# Altium PCB STM32_Dev_Board.PcbDoc (part 2 of 2)
Units mm, origin at the board's own origin, x right, y up, seen from the top; angles counter-clockwise.
Board outline 84.25 x 50.53 mm, 4 copper layers (Top Layer, Int1 (GND), Int2 (PWR), Bottom Layer), stack 1.57 mm thick; 70 components, 69 nets, 319 pads, 189 vias.
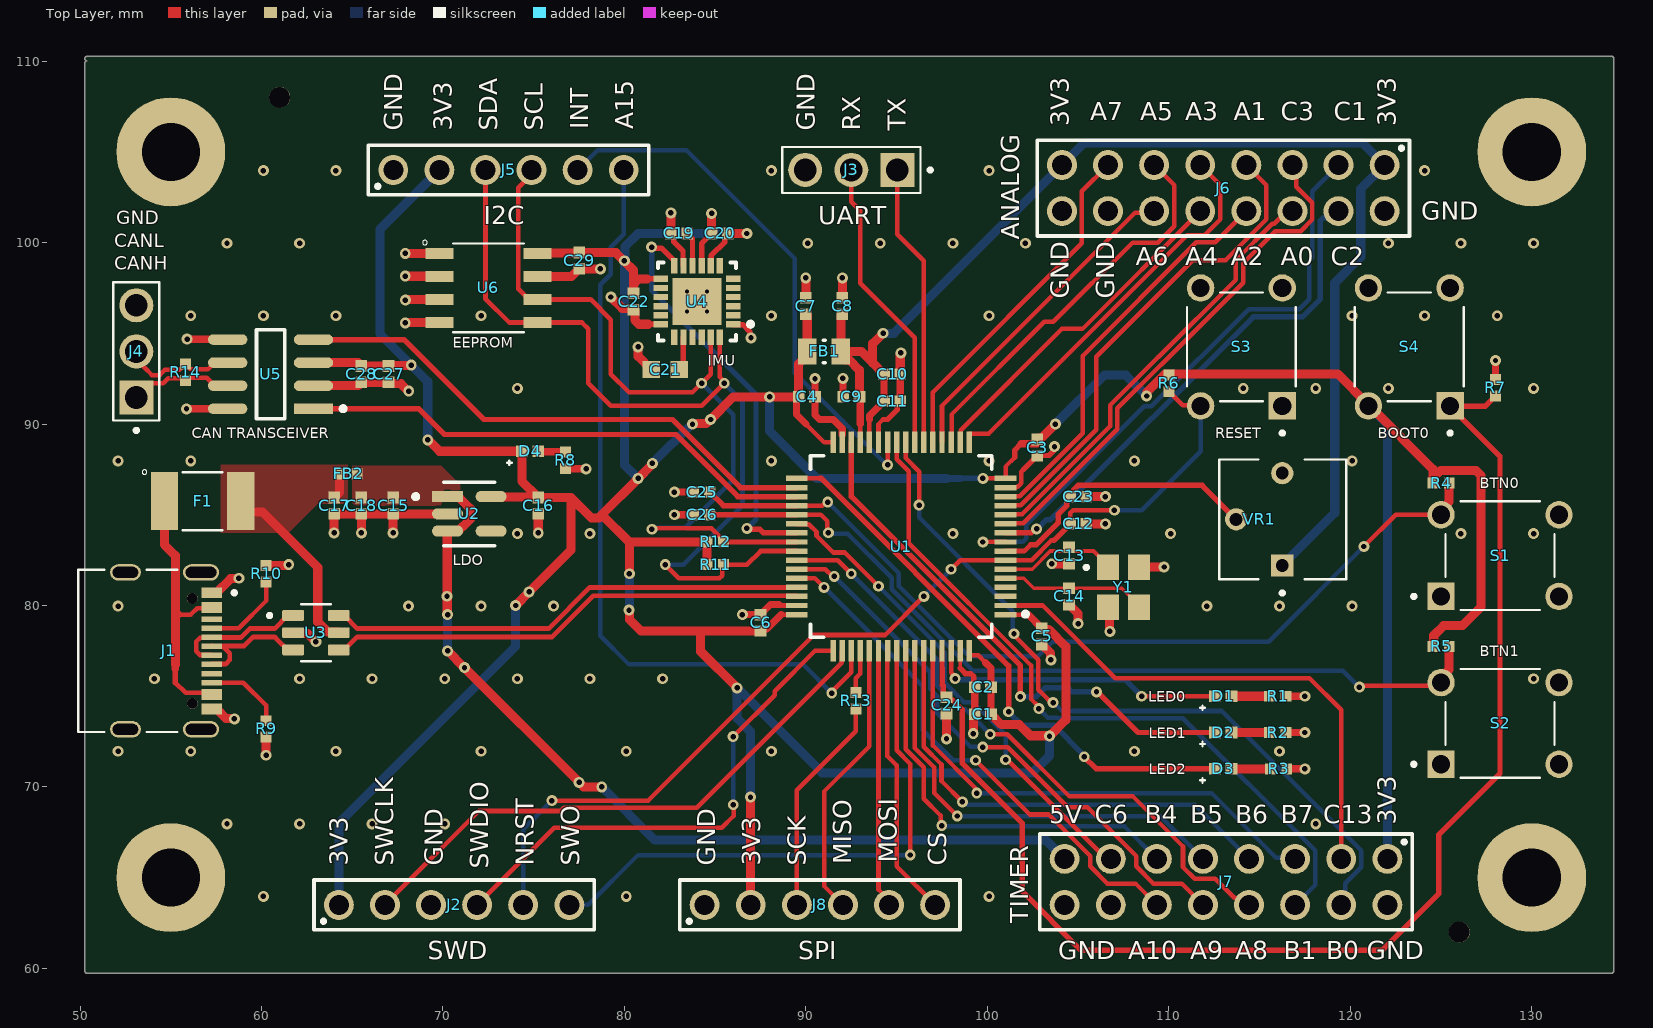
[diagram p0: Top Layer view]

## Via types
v1: diameter 0.6, hole 0.3, Top Layer to Bottom Layer, 185 vias
v2: diameter 0.5, hole 0.2, Top Layer to Bottom Layer, 4 vias

## Nets (pads, with @x,y where several pads share a name; then routed paths per layer and width w, separated by ;. In a path a pad name is that pad's centre, name@x,y a point inside that pad or via, vN(x,y) a via of type N, cw(c..) or ccw(c..) an arc to the next point about the centre after c; other vN are vias at no path point) (continued)
I2C3_SCL: (continued)
  Top Layer w0.26: J5.4 74.88,103.752 74.145,103.016 74.145,97.445 74.725,96.865 U6.6 78.135,96.865 79.25,95.75 79.25,92.75 80.25,91.75 83.75,91.75 84.75,92.75 U4.23 ; v1(81.508,84.2) 81.558,84.25 84.796,84.25 85.28,83.766 85.28,83.67 R12.1 U1.40
  Bottom Layer w0.26: v1(81.508,84.2) 81.573,84.265 83.329,84.265 86,86.936 86,90.5 v1(84.25,92.25)
I2C3_SDA: J5.3 R11.1 U1.41 U4.24 U6.5 | length 48.9
  Top Layer w0.26: J5.3 72.34,96.91 73.655,95.595 U6.5 77.655,95.595 78,95.25 78,92.25 79.25,91 84.25,91 v1(85.5,92.25) 85.5,92.342 85.25,92.592 U4.24 ; v1(82.25,82.25) 83,81.5 85.235,81.5 85.388,81.652 85.388,82.188 R11.1 86.75,82.25 87.5,83 U1.41
  Bottom Layer w0.26: v1(82.25,82.25) 83.25,82.25 86.5,85.5 86.5,91.25 v1(85.5,92.25)
IMU_CPOUT: C21.2 U4.20 | length 1.9
  Top Layer w0.3: C21.2 83.25,93.225 U4.20
IMU_INT: U1.39 U4.12 | length 22.8
  Top Layer w0.3: v1(81.5,99.75) 81.557,99.693 82.032,99.693 82.75,98.975 U4.12 ; v1(86.75,84.25) 86.807,84.193 87.457,84.193 87.65,84 U1.39
  Bottom Layer w0.3: v1(81.5,99.75) 81.5,97.372 87.25,91.622 87.25,84.75 v1(86.75,84.25)
IMU_REGOUT: C19.2 U4.10 | length 1.9
  Top Layer w0.3: C19.2 83.75,100.2 U4.10
JTAG_SWCLK: J2.2 U1.50 | length 31.4
  Top Layer w0.25: J2.2 71.975,68.675 76.489,68.675 76.664,68.85 83.989,68.85 91.975,76.836 91.975,77.475 U1.50
JTAG_SWDIO: J2.4 U1.49 | length 28.1
  Top Layer w0.25: J2.4 76.13,67.75 85.362,67.75 86.011,68.399 v1@86.011,69.006 ; v1(85.984,72.77) 88.276,75.062 88.276,75.276 90.5,77.5 U1.49
  Bottom Layer w0.25: v1(85.984,72.77) 85.991,72.764 85.991,69.026 v1(85.998,69.02)
JTAG_SWO: J2.6 U1.56 | length 31.5
  Top Layer w0.25: U1.56 95,72.015 95.75,71.265 v1(95.75,66.25)
  Bottom Layer w0.25: J2.6 76.974,63.514 78.014,63.514 80.748,66.248 v1@95.748,66.248
LED0: D1.2 U1.62 | length 16.4
  Top Layer w0.25: U1.62 98,76.288 98.222,76.066 v1(98.222,75.972) ; v1(108.5,75) D1.2
  Bottom Layer w0.3: v1(98.222,75.972) 98.276,75.917 107.583,75.917 v1(108.5,75)
LED1: D2.2 U1.30 | length 29.8
  Top Layer w0.3: U1.30 92.5,85.998 101.815,76.683 v1(101.815,74.975) ; v1(106.014,75.238) 106.065,75.238 108.301,73.001 112.549,73.001 D2.2
  Bottom Layer w0.3: v1(101.815,74.975) 102.7,74.975 103.185,75.46 104.445,75.46 104.667,75.238 v1(106.014,75.238)
LED2: D3.2 U1.33 | length 31.2
  Top Layer w0.25: U1.33 90.77,87
  Top Layer w0.3: 90.77,87 90.849,87 101.173,76.675 v1(101.173,74.144) ; v1(105.337,71.664) 105.992,71.009 112.541,71.009 D3.2
  Bottom Layer w0.3: v1(101.173,74.144) 101.916,73.401 103.671,73.401 105.337,71.734 v1(105.337,71.664)
MCU_BOOT0: C24.2 R7.2 S4.1 U1.61 | length 72.7
  Top Layer w0.26: 97.5,76.57 U1.61
  Top Layer w0.3: 97.52,76.55 97.52,75.631 97.58,75.571 97.58,75.12 C24.2@97.681,75.019 ; C24.2@97.801,74.848 97.869,74.78 98.084,74.78 98.622,74.243 98.622,71.303 101.91,68.014 101.91,64.259 105.169,61 121.75,61 124.875,64.125 124.875,67.375 128.25,70.75 128.25,88.22 126.104,90.366 126.104,90.396 S4.1@125.53,90.97 ; S4.1@125.511,90.989 127.439,90.989 R7.2
  Top Layer w0.4: C24.2@97.681,75.019 C24.2
MCU_NRST: C12.2 J2.5 R6.1 S3.3 U1.7 | length 55.6
  Top Layer w0.25: v1(76,69.25) 81.313,69.25 90.438,78.375 94.375,78.375 v1(96.5,80.5) ; v1(98,82) 98.5,82.5 U1.7 102.442,82.5 103.529,83.587 103.663,83.587 ; C12.2 104.573,84.523 104.573,85.099 104.724,85.25 v1(107,85.25) ; R6.1 110.767,91.033 111.717,91.033 S3.3@111.745,91.005
  Top Layer w0.3: 103.663,83.587 104.348,84.273 104.348,84.298 C12.2
  Bottom Layer w0.25: J2.5 74.42,67.67 v1(76,69.25) ; v1(96.5,80.5) v1(98,82) ; v1(107,85.25) 108.5,85.25 111.75,88.5 S3.3@111.75,91.5
MCU_OSC_IN: C14.2 U1.5 Y1.3 | length 8.1
  Top Layer w0.2: U1.5 102,81.5 102.55,80.95 C14.2 107.4,80.95 108.35,80 Y1.3
MCU_OSC_OUT: C13.2 U1.6 Y1.1 | length 6.7
  Top Layer w0.2: U1.6 102.472,82 103.472,83 104.3,83 C13.2 104.7,83 105.85,83 106.65,82.2 Y1.1
NetC23_2: C23.2 U1.8 VR1.2 | length 15.5
  Top Layer w0.26: U1.8 102.025,83 102.378,83.353
  Top Layer w0.3: 102.378,83.353 102.694,83.353 103.898,84.557 103.898,85.025 104.38,85.507 104.38,85.842 C23.2@104.538,86 ; C23.2 104.72,86.17 104.72,86.334 105.006,86.62 111.84,86.62 VR1.2
NetD1_1: D1.1 R1.2 | length 2.1
  Top Layer w0.5: D1.1 R1.2
NetD2_1: D2.1 R2.2 | length 2.1
  Top Layer w0.5: D2.1 R2.2
NetD3_1: D3.1 R3.2 | length 2.1
  Top Layer w0.5: D3.1 R3.2
NetD4_1: D4.1 R8.2 | length 1.5
  Top Layer w0.4: D4.1 75.275,88.475 76.725,88.475 R8.2
NetF1_1: F1.1 J1.A4_B9 J1.B4_A9 | length 14.8
  Top Layer w0.25: 55.25,75.75 55.815,75.185 57.165,75.185 J1.B4_A9 ; 55.5,79.5 56.103,79.5 56.451,79.848 57.198,79.848 J1.A4_B9
  Top Layer w0.3: 55.25,75.75 55.25,76.5 ; 55.25,79.75 55.5,79.5
  Top Layer w0.4: 55.25,76.5 55.25,76.75
  Top Layer w0.5: F1.1 54.65,83.35 55.25,82.75 55.25,79.75 55.25,76.75
NetJ1_A5: J1.A5 R10.2 | length 4.7
  Top Layer w0.25: J1.A5 58.75,78.75 60.25,80.25 R10.2
NetJ1_B5: J1.B5 R9.2 | length 4.4
  Top Layer w0.25: J1.B5 59,75.75 60.25,74.5 R9.2
NetJ8_3: J8.3 R13.2 | length 12.1
  Top Layer w0.25: J8.3 89.5,69.813 92.75,73.063 R13.2
PA0: J6.6 U1.12 | length 24.1
  Top Layer w0.25: U1.12 101.025,85.025 101.909,85.025 106.759,89.875 106.759,91.033 109.401,93.675 109.425,93.675 113.699,97.949 113.699,99.038 115.691,101.03 115.813,101.03 116.513,101.73 J6.6
PA1: J6.7 U1.13 | length 26.7
  Top Layer w0.25: U1.13 101.025,85.525 101.844,85.525 106,89.681 106,93.705 111.324,99.029 113.125,99.029 115.37,101.274 115.37,103.17 J6.7
PA2: J6.8 U1.14 | length 22.3
  Top Layer w0.25: U1.14 101.025,86.025 101.778,86.025 105.25,89.497 105.25,93.75 111.512,100.012 112.552,100.012 J6.8
PA3: J6.9 U1.17 | length 22.6
  Top Layer w0.25: U1.17 99,89.45 99.025,89.475 100.066,89.475 111.003,100.412 111.967,100.412 112.83,101.274 112.83,103.17 J6.9
PA4: J6.10 U1.18 | length 18.9
  Top Layer w0.25: U1.18 98.525,89.025 98.525,89.664 104.1,95.239 105.239,95.239 J6.10
PA5: J6.11 U1.19 | length 21.9
  Top Layer w0.25: U1.19 98.025,89.025 98.025,90.525 103.139,95.639 103.639,95.639 107.999,99.999 109.391,99.999 110.29,100.899 110.29,103.17 J6.11
PA6: J6.12 U1.20 | length 18.1
  Top Layer w0.25: U1.20 97.5,91 108.136,101.636 109.096,101.636 J6.12
PA7: J6.13 U1.21 | length 19.3
  Top Layer w0.25: U1.21 97,91.75 105.21,99.96 105.21,102.83 J6.13
PA8: J7.8 U1.42 | length 34.3
  Top Layer w0.25: U1.42 91.75,82.5 v1(92.5,81.75) ; v1(100.157,72.905) 101.095,72.905 104.5,69.5 108,69.5 110.78,66.72 110.78,65.584 111.424,64.94 112.56,64.94 113.611,63.889 113.653,63.889 114.041,63.5 J7.8
  Bottom Layer w0.25: v1(92.5,81.75) 97.247,77.003 97.247,75.568 98.544,74.271 98.792,74.271 v1(100.157,72.905)
PA9: J7.10 U1.43 | length 31.5
  Top Layer w0.25: U1.43 91.068,82 91.466,81.602 v1(91.56,81.602) ; v1(99.745,72.193) 101.12,72.193 104.432,68.881 105.514,68.881 108.202,66.194 108.202,65.622 109.148,64.676 110.704,64.676 J7.10
  Bottom Layer w0.25: v1(91.56,81.602) 96.847,76.316 96.847,75.402 97.247,75.002 97.247,74.046 99.07,72.223 99.714,72.223 v1(99.745,72.193)
PA10: J7.12 U1.44 | length 29
  Top Layer w0.25: U1.44 90.499,81.5 v1(90.999,81) ; v1(99.348,71.471) 102.338,68.481 103.374,68.481 105.662,66.194 105.662,65.622 106.608,64.676 108.164,64.676 J7.12
  Bottom Layer w0.25: v1(90.999,81) 91,81 96.447,75.553 96.447,73.134 98.11,71.471 v1(99.348,71.471)
PA15: J5.6 U1.51 | length 43
  Top Layer w0.25: v1(91.425,75.171) 91.425,75.241 92.5,76.316 U1.51
  Bottom Layer w0.25: J5.6 79.96,100.452 79.25,99.742 79.25,98.25 78.675,97.675 78.675,78.325 80.25,76.75 89.846,76.75 v1(91.425,75.171)
PB0: J7.4 U1.24 | length 41.6
  Top Layer w0.25: U1.24 95.5,88.129 96.25,87.379 96.25,85.539 v1(96.239,85.528) ; v1(101.468,78.444) 101.468,78.353 102.806,77.015 102.806,75.364 103.102,75.068 103.106,75.068 103.527,74.647 v1(103.622,74.647)
  Bottom Layer w0.25: v1(96.239,85.528) 96.241,85.525 96.241,84.853 101.401,79.692 101.401,78.511 v1(101.468,78.444) ; v1(103.622,74.647) 103.652,74.647 104.114,74.185 112.91,74.185 120.6,66.496 120.6,65.584 119.716,64.7 119.716,63.716 J7.4
PB1: J7.6 U1.25 | length 39.8
  Top Layer w0.25: U1.25 95,88.063 95.664,87.399 95.664,83.436 102.406,76.693 102.406,74.844 102.836,74.414 v1(102.836,74.319)
  Bottom Layer w0.25: v1(102.836,74.319) 103.329,73.826 103.847,73.826 103.887,73.785 110.77,73.785 118.06,66.496 118.06,64.6 J7.6
PB4: J7.11 U1.57 | length 23.1
  Top Layer w0.25: U1.57 95.5,72.081 96.5,71.081 96.5,69.345 97.418,68.427 97.418,67.938 v1(97.485,67.871)
  Bottom Layer w0.25: v1(97.485,67.871) 97.531,67.825 107.555,67.825 J7.11
PB5: J7.9 U1.58 | length 24.6
  Top Layer w0.25: U1.58 96,72.147 97.072,71.075 97.072,69.667 v1(98.338,68.4)
  Bottom Layer w0.25: v1@98.352,68.386 109.534,68.386 J7.9
PB6: J7.7 U1.59 | length 26.3
  Top Layer w0.25: U1.59 96.5,72.212 97.471,71.241 97.471,70.326 v1(98.621,69.177)
  Bottom Layer w0.25: v1(98.621,69.177) 98.715,69.177 98.885,69.007 111.453,69.007 J7.7
PB7: J7.5 U1.60 | length 27.9
  Top Layer w0.25: U1.60 97,72.282 99.345,69.937 99.345,69.731 v1(99.412,69.664)
  Bottom Layer w0.25: v1(99.412,69.664) 112.351,69.665 115.52,66.496 115.52,66.48 115.906,66.094 116.906,66.094 J7.5
PC1: J6.3 U1.9 | length 33.3
  Top Layer w0.25: v1(99.75,83.5) U1.9
  Bottom Layer w0.25: v1(99.75,83.5) 101.943,83.5 102.138,83.695 102.138,84.459 108.65,90.971 109.032,90.971 114.395,96.334 117.192,96.334 117.732,96.873 117.732,98.982 117.91,99.16 117.91,102.83 J6.3
PC2: J6.4 U1.10 | length 28.2
  Top Layer w0.3: U1.10 102.411,84 102.632,84.221 v1(102.713,84.221)
  Bottom Layer w0.3: v1(102.713,84.221) 102.759,84.221 103.266,84.728 103.478,84.728 114.659,95.909 117.368,95.909 118.335,96.875 118.335,101.19 118.511,101.366 118.621,101.366 118.985,101.73 J6.4
PC3: J6.5 U1.11 | length 28.6
  Top Layer w0.25: U1.11 101.025,84.525 101.975,84.525 107.159,89.709 107.159,90.867 109.567,93.275 109.591,93.275 114.099,97.784 114.099,98.872 115.857,100.63 117.266,100.63 117.91,101.274 117.91,102.186 117.026,103.07 117.026,104.054 J6.5
PC6: J7.13 U1.38 | length 26.9
  Top Layer w0.25: U1.38 89.525,84.475 90.164,84.475 90.583,84.056 90.583,83.853 91.516,82.92 92.143,82.92 v1(94,81.063) ; v1(101,71.5) 101.095,71.5 106.555,66.04 J7.13
  Bottom Layer w0.25: v1(94,81.063) 94,81.055 97.647,77.409 97.647,75.733 98.709,74.671 99.205,74.671 101,72.875 v1(101,71.5)
PC13: J7.3 U1.2 | length 29.1
  Top Layer w0.25: U1.2 103.049,80 107.049,76 117.75,76 119.5,74.25 J7.3
SPI_CS: J8.6 U1.55 | length 15.1
  Top Layer w0.25: U1.55@94.493,77.493 94.493,71.691 95,71.184 95,65.62 J8.6
SPI_MISO: J8.4 U1.53 | length 15.5
  Top Layer w0.25: J8.4 91,64.54 91,69.75 93.5,72.25 U1.53
SPI_MOSI: J8.5 U1.54 | length 14.2
  Top Layer w0.25: U1.54 94,64.346 94.58,63.766 J8.5
SPI_SCK: R13.1 U1.52 | length 2.4
  Top Layer w0.25: R13.1 92.75,76 93,76.25 U1.52
USART1_RX: J3.2 U1.23 | length 16.4
  Top Layer w0.25: J3.2 92.5,102.25 93,101.75 93,97.75 96,94.75 U1.23
USART1_TX: J3.1 U1.22 | length 15.6
  Top Layer w0.25: J3.1 95.04,100.46 96.5,99 U1.22
USB_CONN_D_N: J1.A7 J1.B7 U3.1 | length 7.4
  Top Layer w0.26: J1.A7 57.23,77.27 56.614,77.27 56.4,77.484 56.4,78.016 56.614,78.23 57.267,78.23 57.268,78.232 58.845,78.232 59.345,78.732 60.717,78.732 61.435,79.45 U3.1
USB_CONN_D_P: J1.A6 J1.B6 U3.3 | length 7
  Top Layer w0.26: J1.B6 57.27,76.77 58.02,76.77 58.25,77 58.25,77.366 57.886,77.73 57.307,77.73 J1.A6@57.268,77.768 ; 57.886,77.768 59.037,77.768 59.537,78.268 60.724,78.268 60.902,78.09 60.902,78.083 61.435,77.55 U3.3
USB_D_N: U1.45 U3.6 | length 26.5
  Top Layer w0.26: U3.6 64.565,79.45 65.283,78.732 75.828,78.732 78.09,80.993 89.493,80.993 U1.45
USB_D_P: U1.46 U3.4 | length 26.5
  Top Layer w0.26: U3.4 64.565,77.55 65.283,78.268 76.02,78.268 78.282,80.53 88.98,80.53 88.99,80.52 89.48,80.52 U1.46
pads on no net: J1. J1.A8 J1.B8 S1.2 S1.4 S2.2 S2.4 S3.2 S3.4 S4.2 S4.4 U1.3 U1.4 U2.4 U4.2 U4.3 U4.4 U4.5 U4.6 U4.7 U4.14 U4.15 U4.16 U4.17 U4.19 U4.21 U4.22

## Polygon pours and split planes (outlines as drawn)
+5V on Top Layer "+5V_L01_P001" (solid, pour order 1): 64.9,87.7 64.9,85.6 65,85.5 71.1,85.5 71.1,86.5 69.9,87.7
+VBUS on Top Layer "+VBUS_L01_P000" (solid, pour order 0): 57.75,84 61.5,84 63.1,85.6 64.75,85.6 64.75,87.75 57.75,87.75
GND on Int1 (GND) "GND_L02_P002" (solid, pour order 2): 51.25,60.5 51.25,109.25 133.5,109.25 133.5,60.5
GND on Int2 (PWR) "GND_L03_P003" (solid, pour order 3): 51.25,60.5 51.25,109.25 133.5,109.25 133.5,60.5

## Silkscreen, mask and mechanical layers (free items; w line width, h text height)
Top Overlay:
  text "A7" at 105.667,106.754 h1
  text "A5" at 108.417,106.754 h1
  text "A3" at 110.917,106.754 h1
  text "A1" at 113.584,106.754 h1
  text "C3" at 116.167,106.754 h1
  text "C1" at 119.084,106.754 h1
  text "3V3" at 104.496,106.417 h1 r90
  text "3V3" at 122.496,106.417 h1 r90
  text "INT" at 77.996,106.25 h1 r90
  text "A15" at 80.496,106.25 h1 r90
  text "GND" at 67.746,106.167 h1 r90
  text "3V3" at 70.496,106.167 h1 r90
  text "SDA" at 72.996,106.167 h1 r90
  text "SCL" at 75.496,106.167 h1 r90
  text "GND" at 90.496,106.167 h1 r90
  text "RX" at 92.996,106.167 h1 r90
  text "TX" at 95.496,106.167 h1 r90
  text "GND" at 123.917,101.254 h1
  text "GND" at 52,101.004 h0.75
  text "I2C" at 72.25,101.004 h1
  text "UART" at 90.667,101.004 h1
  text "ANALOG" at 101.746,100.168 h1 r90
  text "CANL" at 51.875,99.754 h0.75
  text "A6" at 108.167,98.754 h1
  text "A4" at 110.917,98.754 h1
  text "A2" at 113.417,98.754 h1
  text "A0" at 116.167,98.754 h1
  text "C2" at 118.917,98.754 h1
  text "CANH" at 51.875,98.504 h0.75
  text "GND" at 104.496,96.917 h1 r90
  text "GND" at 106.996,96.917 h1 r90
  text "EEPROM" at 70.539,94.014 h1
  text "IMU" at 84.591,93.014 h1
  text "CAN TRANSCEIVER" at 56.144,89.014 h1
  text "RESET" at 112.548,89.014 h1
  text "BOOT0" at 121.499,89.014 h1
  text "BTN0" at 127.124,86.264 h1
  text "LDO" at 70.549,82.014 h1
  text "BTN1" at 127.142,77.014 h1
  text "LED0" at 108.873,74.512 h1
  text "LED1" at 108.891,72.5 h1
  text "LED2" at 108.879,70.5 h1
  text "5V" at 103.417,68.004 h1
  text "C6" at 105.917,68.004 h1
  text "B4" at 108.667,68.004 h1
  text "B5" at 111.167,68.004 h1
  text "B6" at 113.667,68.004 h1
  text "B7" at 116.167,68.004 h1
  text "C13" at 118.5,68.004 h1
  text "3V3" at 122.496,67.917 h1 r90
  text "MOSI" at 94.996,65.834 h1 r90
  text "MISO" at 92.496,65.751 h1 r90
  text "3V3" at 64.746,65.667 h1 r90
  text "SWCLK" at 67.246,65.667 h1 r90
  text "GND" at 69.996,65.667 h1 r90
  text "NRST" at 74.996,65.667 h1 r90
  text "SWO" at 77.496,65.667 h1 r90
  text "GND" at 84.996,65.667 h1 r90
  text "3V3" at 87.496,65.667 h1 r90
  text "SCK" at 89.996,65.667 h1 r90
  text "CS" at 97.746,65.667 h1 r90
  text "SWDIO" at 72.496,65.501 h1 r90
  text "TIMER" at 102.246,62.501 h1 r90
  text "SWD" at 69.167,60.504 h1
  text "SPI" at 89.584,60.504 h1
  text "GND" at 103.917,60.504 h1
  text "A10" at 107.75,60.504 h1
  text "A9" at 111.167,60.504 h1
  text "A8" at 113.667,60.504 h1
  text "B1" at 116.334,60.504 h1
  text "B0" at 118.667,60.504 h1
  text "GND" at 120.917,60.504 h1
Mechanical 1:
  the board outline again, w1

## Text inside footprints (layer, text, board x,y; h text height)
J1: Mechanical 13 "PCB EDGE" at 50.6,72.3 h1 r270